# Altium PCB Edge Connector PCB with Solder Pads.PcbDoc
Units mil, origin at the board's own origin, x right, y up, seen from the top; angles counter-clockwise.
Board outline 421.24 x 305 mil, 2 copper layers (Top Layer, Bottom Layer), stack 69.729 mil thick; 13 components, 4 nets, 8 pads, 0 vias.
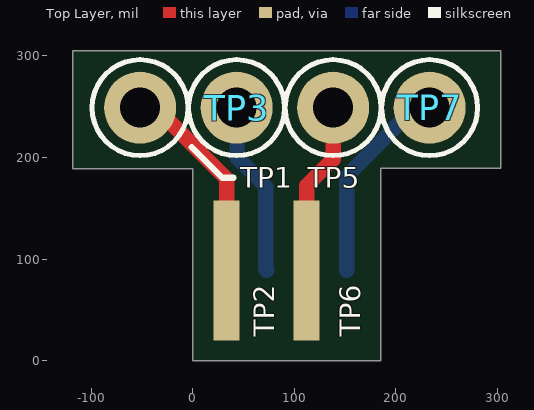
[diagram p0: Top Layer view]
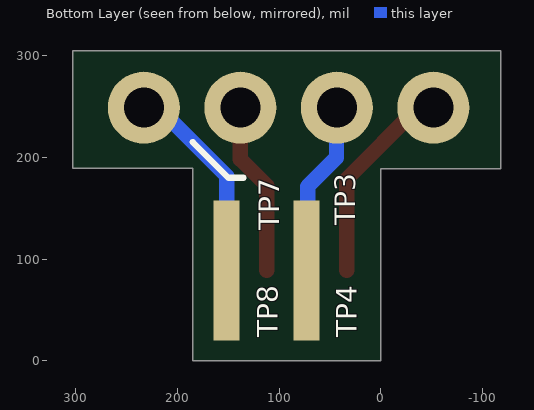
[diagram p1: Bottom Layer view, seen from below]

## Layer stack, top to bottom
Top Solder: solder mask 0.4, Solder Resist, Dk 3.5
Top Layer: signal copper 1.4
Dielectric 1: dielectric 66.9291, FR-4, Dk 4.8
Bottom Layer: signal copper 1.4
Bottom Solder: solder mask 0.4, Solder Resist, Dk 3.5

## Board outline
-118.11,188.98 0,188.98 0,0 185.04,0 185.04,188.98 185.02,189.32 303.13,189.32 303.13,305 -118.11,305

## Design rules (kind name [scope] priority, off if disabled: settings)
Clearance [All] p1: gap=10 ignorepadtopadclearanceinfootprint=FALSE
PolygonConnect [All] p1: connectstyle=Relief reliefconductorwidth=10 reliefentries=4 polygonreliefangle="90 Angle" airgapwidth=10
RoutingVias [All] p1: holewidth=28 width=50 viastyle="Through Hole" minholewidth=28 minwidth=50 maxholewidth=28 maxwidth=50
SolderMaskExpansion [All] p1: expansion=4 istentingtop=FALSE
Width [All] p1: maxlimit=39.37 minlimit=10 preferedwidth=10
30 further rules are at their usual default settings.

## Classes and differential pairs
component class "Edge Connector PCB with Solder Pads": TP1 TP2 TP3 TP4 TP5 TP6 TP7

## Components (designator, comment, footprint, x,y, rotation, side; value= is the part's Value field where it differs from the comment)
Designator1 "Comment" 5_00_9159_004_651_9_0_6_b_0_in_009159004651906_0 189.09,1110 r0 top
Designator1 "Comment" 4_00_9159_004_651_9_0_6_P_2_0_in_009159004651906_0 189.09,1110 r0 top
Designator1 "Comment" 3_00_9159_004_651_9_0_6_P_1_0_in_009159004651906_0 189.09,1110 r0 top
Designator1 "Comment" 2_00_9159_004_651_9_0_6_P2_2_0_in_009159004651906_0 189.09,1110 r0 top
Designator1 "Comment" 1_00_9159_004_651_9_0_6_P2_1_0_in_009159004651906_0 189.09,1110 r0 top
TP1 "5122" KEYSTONE_5122 -51.81,248.94 r0 top
TP2 "5017" KEYSTONE_5017#1 34.09,75.32 r90 top
TP3 "5122" KEYSTONE_5122 43.19,248.94 r0 top
TP4 "5017" KEYSTONE_5017#2 72.83,88.9 r270 bottom
TP5 "5122" KEYSTONE_5122 138.19,248.94 r0 top
TP6 "5017" KEYSTONE_5017#3 114.09,88.9 r90 top
TP7 "5122" KEYSTONE_5122 233.19,248.94 r0 top
TP8 "5017" KEYSTONE_5017#2 151.57,88.9 r90 bottom

## Footprints (in the part's own frame and the unit in brackets; to place one, negate y for a bottom-side part, rotate by r counter-clockwise, add the part's x,y. Pads: shape width x height; smd on the part's side, far side on the other; paste and mask are expansions set on the pad)
1_00_9159_004_651_9_0_6_P2_1_0_in_009159004651906_0 [mil]
2_00_9159_004_651_9_0_6_P2_2_0_in_009159004651906_0 [mil]
3_00_9159_004_651_9_0_6_P_1_0_in_009159004651906_0 [mil]
4_00_9159_004_651_9_0_6_P_2_0_in_009159004651906_0 [mil]
5_00_9159_004_651_9_0_6_b_0_in_009159004651906_0 [mil]
KEYSTONE_5017#1 [mm]
  rect 3.5x0.65 smd: TP(0.345,0.016)
KEYSTONE_5017#2 [mm]
  rect 3.5x0.65 smd: TP(0,0)
KEYSTONE_5017#3 [mm]
  rect 3.5x0.65 smd: TP(0,0.048)
KEYSTONE_5122 [mm]
  round 1.8 hole 1: TP(0,0)
  silkscreen extent -1.2,-1.2 1.2,1.2

## Part data
TP1 TP3 TP5 TP7: "Blue PC Test Point, Compact Phosphor Bronze Silver Plating 0.063 (1.60mm) Hole Diameter Mounting Type", Package=None, Check_prices=https://www.snapeda.com/parts/5122/Keystone+Electronics/view-part/?ref=eda, Digi-Key_Part_Number=36-5122-ND, MF="Keystone Electronics", MP=5122, Purchase-URL=https://pricing.snapeda.com/search?q=5122&ref=eda, SnapEDA_Link=https://www.snapeda.com/parts/5122/Keystone+Electronics/view-part/?ref=snap
TP2 TP4 TP6 TP8: "SMT Test Point- Micro Mininature-5000 pc Reels", Package=None, Check_prices=https://www.snapeda.com/parts/5017/Keystone+Electronics/view-part/?ref=eda, MF="Keystone Electronics", MP=5017, SnapEDA_Link=https://www.snapeda.com/parts/5017/Keystone+Electronics/view-part/?ref=snap

## Nets (pads, with @x,y where several pads share a name; then routed paths per layer and width w, separated by ;. In a path a pad name is that pad's centre, name@x,y a point inside that pad or via, vN(x,y) a via of type N, cw(c..) or ccw(c..) an arc to the next point about the centre after c; other vN are vias at no path point)
NetTP1_TP: TP1.TP TP2.TP | length 204.2
  Top Layer w15: TP1.TP -36.69,248.94 33.46,178.78 TP2.TP
NetTP3_TP: TP3.TP TP4.TP | length 172.3
  Bottom Layer w15: TP3.TP 43.5,248.62 43.5,199.79 71.86,171.43 71.86,89.87 TP4.TP
NetTP5_TP: TP5.TP TP6.TP | length 170.8
  Top Layer w15: TP6.TP 112.2,172.2 138.19,198.19 TP5.TP
NetTP7_TP: TP7.TP TP8.TP | length 202.2
  Bottom Layer w15: TP8.TP 151.57,181.57 218.94,248.94 TP7.TP

## Silkscreen, mask and mechanical layers (free items; w line width, h text height)
Top Overlay:
  lines w6: -0.99,210 29.01,180 40,180
Bottom Overlay:
  lines w6: 135,180 150,180 185,215
Mechanical 1:
  circle w2.5: c189.09,1110 r1.25
  circle w2.5: c189.09,1110 r1.25
  circle w2.5: c189.09,1110 r1.25
  circle w2.5: c189.09,1110 r1.25
Board Shape:
  lines w6: 185.02,189.32 303.13,189.32 303.13,305 -118.11,305 -118.11,188.98 0,188.98 0,0 185.04,0 185.04,188.98
Mechanical 7:
  region: 466,1255.67 455.5,1255.67 460.75,1287.17
  region: 460.75,932.83 455.5,964.33 466,964.33
  region: -14.32,1208.43 -24.82,1208.43 -19.57,1239.92
  region: -19.57,980.08 -24.82,1011.57 -14.32,1011.57
  region: 406.94,1235.98 396.44,1235.98 401.69,1267.48
  region: 401.69,952.52 396.44,984.02 406.94,984.02
  region: 326.89,818.66 295.39,813.41 295.39,823.91
  region: 82.8,813.41 51.3,818.66 82.8,823.91
  region: 169.41,1350.16 137.91,1344.91 137.91,1355.41
  region: 240.28,1344.91 208.78,1350.16 240.28,1355.41
  region: 240.28,856.72 208.78,861.97 240.28,867.22
  region: 130.04,861.97 98.54,856.72 98.54,867.22
  lines w5: -19.57,980.08 51.3,980.08 ; -19.57,1011.57 -19.57,1068.7 ; -19.57,1151.3 -19.57,1208.43 ; -19.57,1239.92 51.3,1239.92 ; 51.3,818.66 51.3,952.52 ; 67.05,861.97 98.54,861.97 ; 76.76,1350.16 169.41,1350.16 ; 82.8,818.66 295.39,818.66 ; 106.42,1350.16 137.91,1350.16 ; 130.04,932.83 130.04,861.97 208.78,861.97 208.78,932.83 208.78,1350.16 169.41,1350.16 ; 169.41,1287.17 169.41,1350.16 ; 240.28,861.97 271.77,861.97 ; 240.28,1350.16 271.77,1350.16 ; 248.15,932.83 460.75,932.83 ; 248.15,1287.17 460.75,1287.17 ; 326.89,818.66 326.89,952.52 401.69,952.52 ; 326.89,1267.48 401.69,1267.48 ; 401.69,984.02 401.69,1089.7 ; 401.69,1130.3 401.69,1235.98 ; 460.75,964.33 460.75,1089.7 ; 460.75,1130.3 460.75,1255.67
  text "1" at 87.84,1359.94 h31.5
  text "6.6" at -51.81,1094.25 h31.5 r90
  text "8" at 391.19,1094.25 h31.5 r90
  text "9" at 451,1094.25 h31.5 r90
  text "2" at 158.91,871.75 h31.5
  text "7" at 178.6,828.36 h31.5
Mechanical 8:
  circle w2.5: c460.75,1287.17 r1.25
  circle w2.5: c248.15,1287.17 r1.25
  circle w2.5: c248.15,932.83 r1.25
  circle w2.5: c-19.57,1239.92 r1.25
  circle w2.5: c51.3,1239.92 r1.25
  circle w2.5: c51.3,980.08 r1.25
  circle w2.5: c401.69,1267.48 r1.25
  circle w2.5: c326.89,1267.48 r1.25
  circle w2.5: c326.89,952.52 r1.25
  circle w2.5: c326.89,818.66 r1.25
  circle w2.5: c326.89,952.52 r1.25
  circle w2.5: c51.3,952.52 r1.25
  circle w2.5: c169.41,1350.16 r1.25
  circle w2.5: c169.41,1287.17 r1.25
  circle w2.5: c208.78,932.83 r1.25
  circle w2.5: c208.78,861.97 r1.25
  circle w2.5: c208.78,932.83 r1.25
  circle w2.5: c130.04,932.83 r1.25
  circle w2.5: c364.17,212.6 r1.25
  circle w2.5: c-45.28,165.35 r1.25
  circle w2.5: c72.83,212.6 r1.25
  circle w2.5: c72.83,275.59 r1.25
  circle w2.5: c151.57,212.6 r1.25
  circle w2.5: c230.31,-255.91 r1.25
  circle w2.5: c230.31,192.91 r1.25
  circle w2.5: c305.12,192.91 r1.25